# Altium PCB BUCK-BOOST_PFC_Mainboard.PcbDoc
Units mm, origin at the board's own origin, x right, y up, seen from the top; angles counter-clockwise.
Board outline 270 x 140 mm, 2 copper layers (Top Layer, Bottom Layer); 102 components, 40 nets, 272 pads, 435 vias.
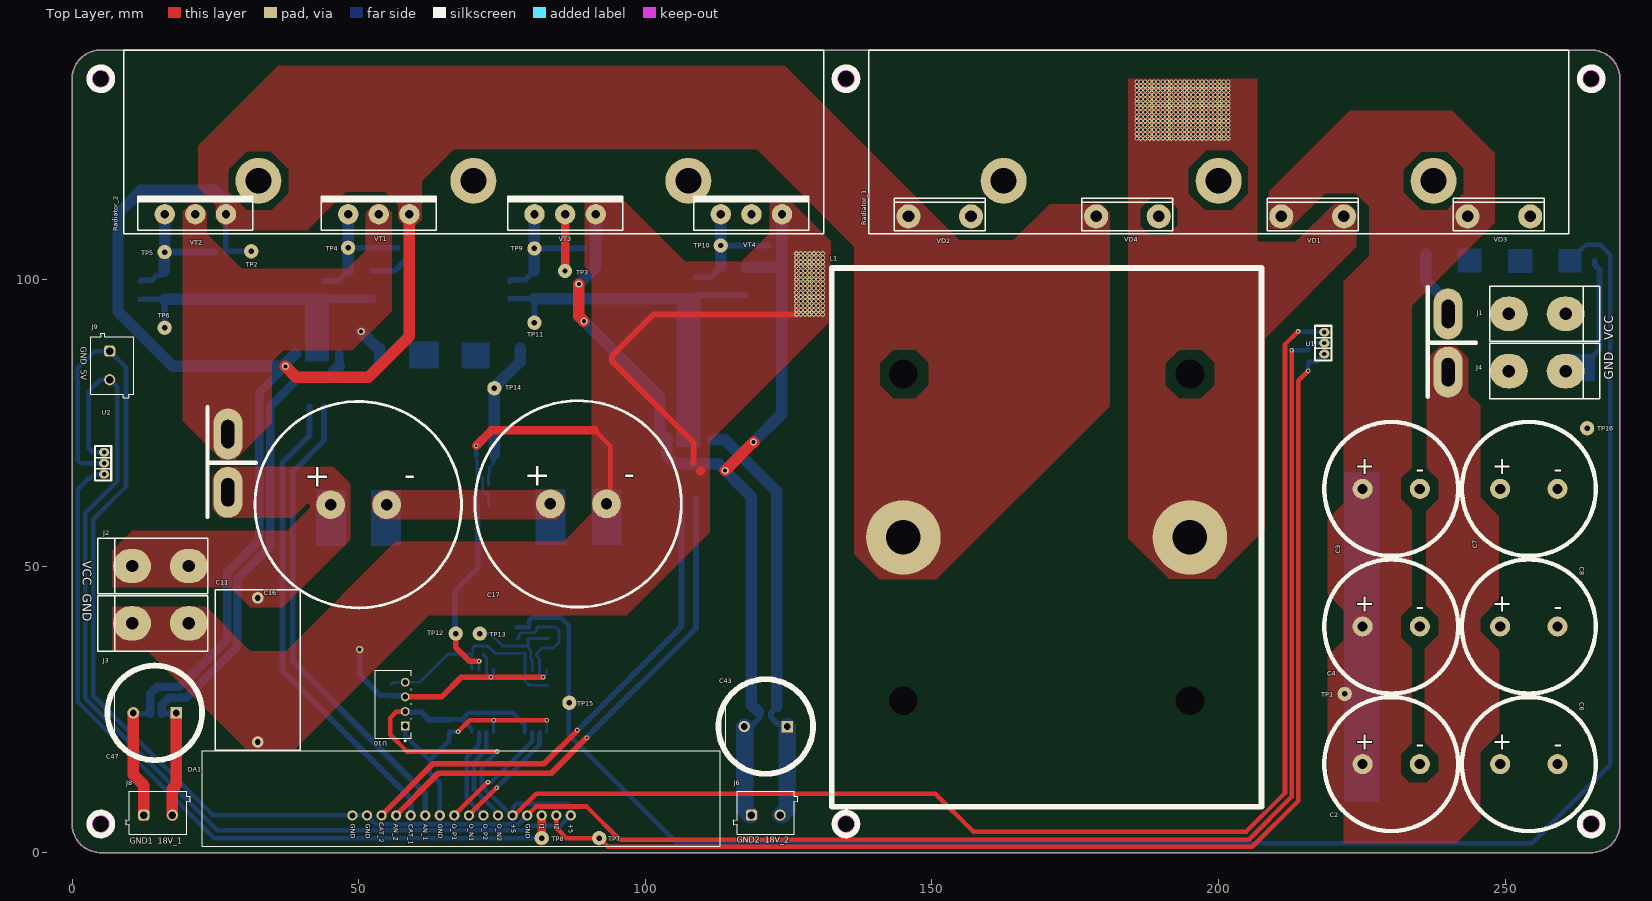
[diagram p0: Top Layer view]
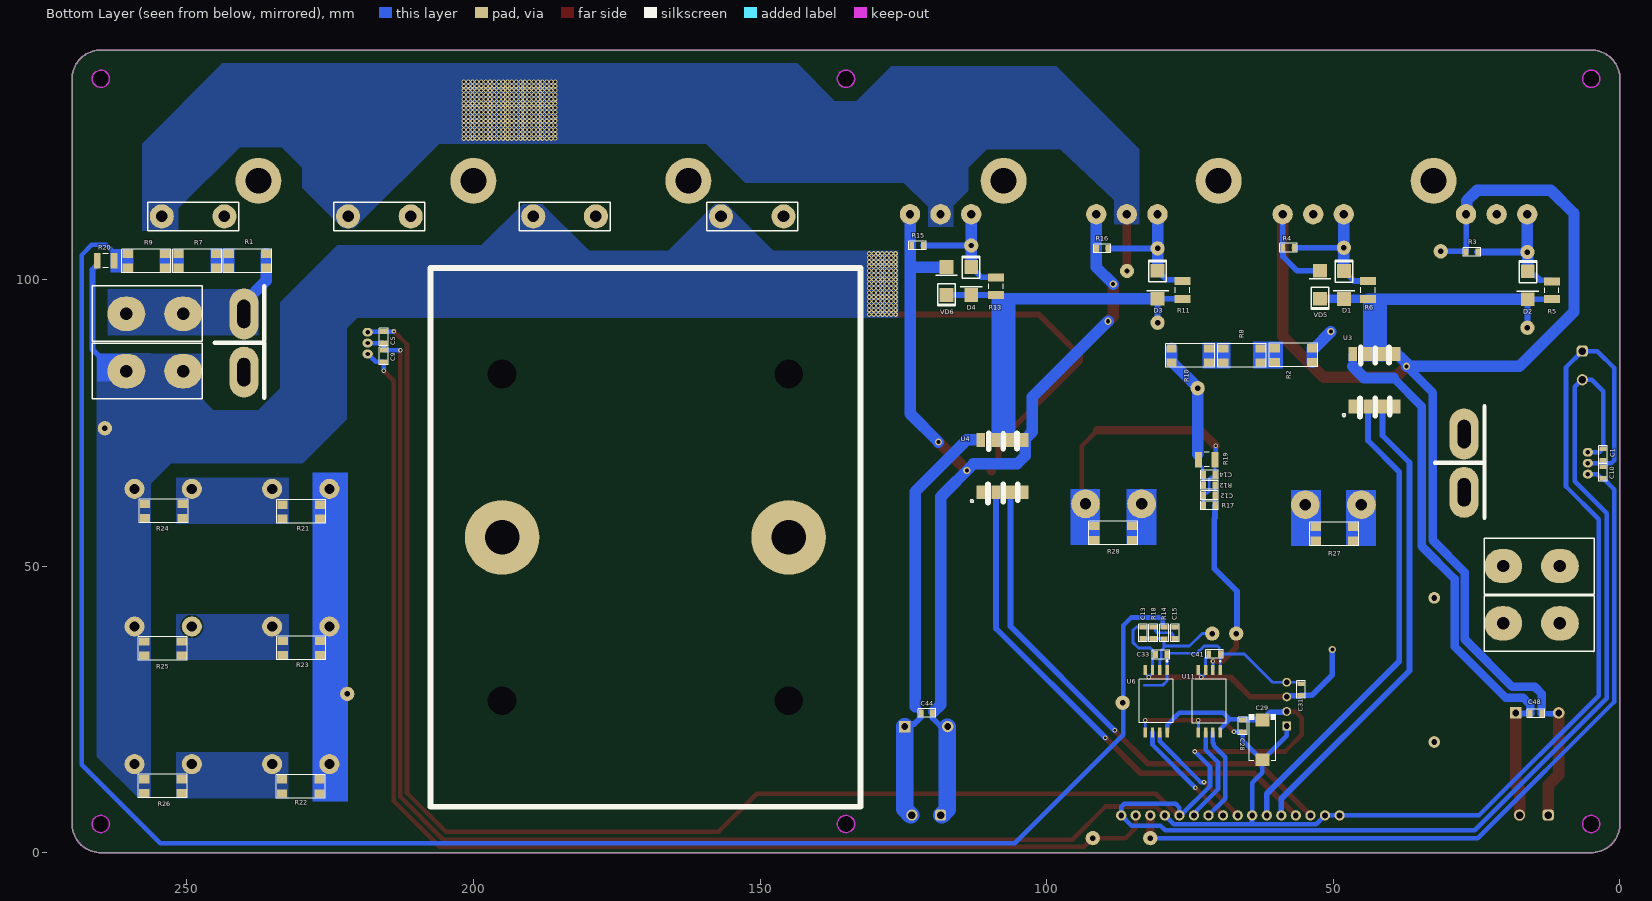
[diagram p1: Bottom Layer view, seen from below]
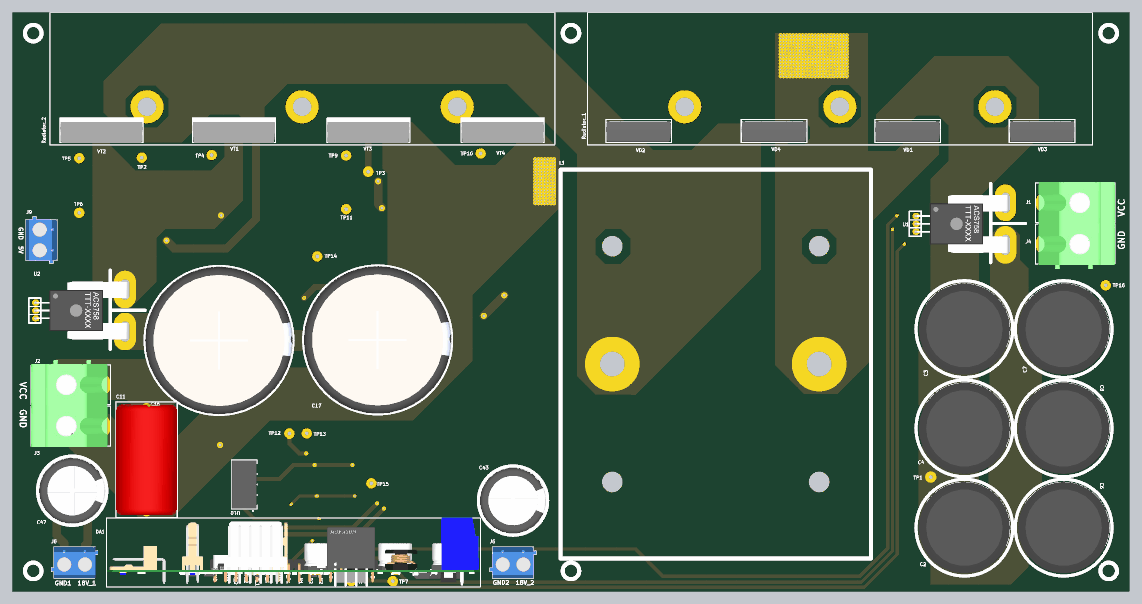
[diagram p2: 3D render of the assembled board from above, using the file's embedded part models]
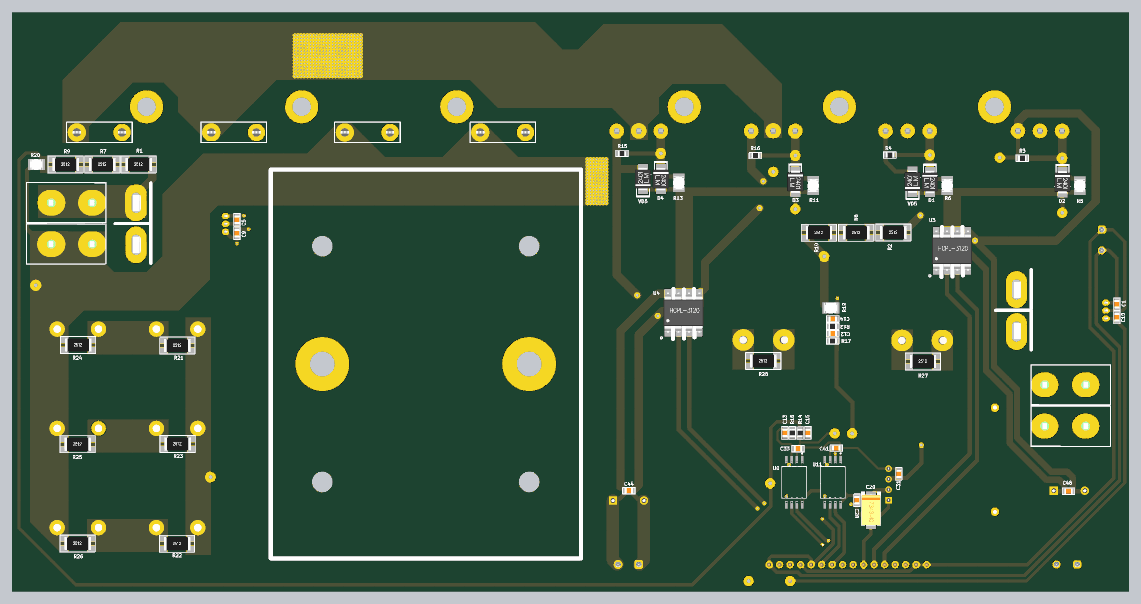
[diagram p3: 3D render of the assembled board from below, using the file's embedded part models]

## Layer stack, top to bottom
Top Solder: solder mask 0.0102, Solder Resist, Dk 3.5
Top Layer: signal copper 0.0356
Dielectric 1: dielectric 0.32, FR-4, Dk 4.8
Bottom Layer: signal copper 0.0356
Bottom Solder: solder mask 0.0102, Solder Resist, Dk 3.5

## Board outline
5,0 cw(c5,5) 0,5 0,135 cw(c5,135) 5,140 265,140 cw(c265,135) 270,135 270,5 cw(c265,5) 265,0
cut-out: 133.5,5 ccw(c135,5) 135,3.5 ccw(c135,5) 136.5,5 ccw(c135,5) 135,6.5 ccw(c135,5)
cut-out: 5,3.5 cw(c5,5) 3.5,5 cw(c5,5) 5,6.5 cw(c5,5) 6.5,5 cw(c5,5)
cut-out: 263.5,5 ccw(c265,5) 265,3.5 ccw(c265,5) 266.5,5 ccw(c265,5) 265,6.5 ccw(c265,5)
cut-out: 263.5,135 ccw(c265,135) 265,133.5 ccw(c265,135) 266.5,135 ccw(c265,135) 265,136.5 ccw(c265,135)
cut-out: 135,133.5 cw(c135,135) 133.5,135 cw(c135,135) 135,136.5 cw(c135,135) 136.5,135 cw(c135,135)
cut-out: 5,133.5 cw(c5,135) 3.5,135 cw(c5,135) 5,136.5 cw(c5,135) 6.5,135 cw(c5,135)

## Design rules (kind name [scope] priority, off if disabled: settings)
Clearance [All] p1: gap=0.254 ignorepadtopadclearanceinfootprint=FALSE except(0: Arc-Hole Track-Hole SMDPad-Hole THPad-Hole Via-Hole Fill-Hole Poly-Hole Region-Hole Text-Hole)
ComponentClearance [All] p1: gap=-2 collisioncheckmode=3 verticalgap=0.254 showdistances=FALSE
Height [All] p1: minheight=0 maxheight=100 prefheight=100
PolygonConnect [All] p1: connectstyle=Relief reliefconductorwidth=0.254 reliefentries=4 polygonreliefangle="90 Angle" airgapwidth=0.254
RoutingVias [All] p1: holewidth=0.711 width=1.27 viastyle="Through Hole" minholewidth=0.711 minwidth=1.27 maxholewidth=0.711 maxwidth=1.27
SolderMaskExpansion [All] p1: expansion=0.102 istentingtop=FALSE
Width [All] p1: maxlimit=5 minlimit=0.254 preferedwidth=0.254
28 further rules are at their usual default settings.

## Components (designator, comment, footprint, x,y, rotation, side; value= is the part's Value field where it differs from the comment)
C1 "1uF" CAP-0805 2.921,69.469 r90 bottom
C2 "CAP-POLAR" "CAP 100uF_500V 22x40mm" 230.115,15.452 r0 top locked
C3 "CAP-POLAR" "CAP 100uF_500V 22x40mm" 230.115,63.452 r0 top locked
C4 "CAP-POLAR" "CAP 100uF_500V 22x40mm" 230.115,39.452 r0 top locked
C5 "1uF" CAP-0805 215.646,89.916 r90 bottom
C6 "CAP-POLAR" "CAP 100uF_500V 22x40mm" 254.115,15.452 r0 top locked
C7 "CAP-POLAR" "CAP 100uF_500V 22x40mm" 254.115,63.452 r0 top locked
C8 "CAP-POLAR" "CAP 100uF_500V 22x40mm" 254.115,39.452 r0 top locked
C9 "0.1uF" CAP-0805 215.646,86.614 r270 bottom
C10 "0.1uF" CAP-0805 2.921,66.294 r270 bottom
C11 "CAP-NON-POLAR" CAP_4.7uF_630V 32.385,31.877 r90 top
C12 "0.33uF" CAP-0805 71.628,62.357 r180 bottom
C13 "0.33uF" CAP-0805 83.185,38.354 r270 bottom
C14 "0.1uF" CAP-0805 71.628,65.913 r0 bottom
C15 "0.1uF" CAP-0805 77.597,38.354 r90 bottom
C16 "CAP-POLAR" CAP_POL_36X60 49.911,60.706 r0 top locked
C17 "CAP-POLAR" CAP_POL_36X60 88.265,60.833 r0 top locked
C28 "0.1uF" CAP-0805 65.786,22.098 r270 bottom
C29 "47uF_16V" CAP-TAN-D 62.357,19.685 r270 bottom
C31 "0.1uF" CAP-0805 55.626,28.448 r90 bottom
C33 "0.1uF" CAP-0805 80.01,34.544 r0 bottom
C41 "0.1uF" CAP-0805 70.739,34.671 r180 bottom
C43 "1000uF_50V" CAPPOL-16x25 121,22 r180 top locked
C44 "0.1uF" CAP-0805 120.904,24.384 r0 bottom
C47 "1000uF_50V" CAPPOL-16x25 14.418,24.384 r180 top locked
C48 "0.1uF" CAP-0805 14.605,24.257 r0 bottom
D1 "US1G" DO-214AA 48.133,96.973 r90 bottom
D2 "US1G" DO-214AA 16.066,96.909 r90 bottom
D3 "US1G" DO-214AA 80.645,97.028 r90 bottom
D4 "US1G" DO-214AA 113.157,97.663 r90 bottom
DA1 "BOARD_PFC" BOARD_PFC 68,10 r180 top locked
J1 "MG_136_HT" Conn_MEIGAN_MG136HT 258,94 r90 top locked
J2 "MG_136_HT" Conn_MEIGAN_MG136HT 13,50 r270 top locked
J3 "MG_136_HT" Conn_MEIGAN_MG136HT 13,40 r270 top locked
J4 "MG_136_HT" Conn_MEIGAN_MG136HT 258,84 r90 top locked
J6 "691102710002" 691102710002 121,7 r0 top locked
J8 "691102710002" 691102710002 15,7 r0 top locked
J9 "691102710002" 691102710002 7,85 r270 top locked
L1 "Coil" 30A_10uH 170,55 r90 top locked
R1 "" RES-2512 239.395,103.251 r180 bottom
R2 "" RES-2512 56.923,86.786 r180 bottom
R3 "4.7K" RES-0805 25.781,104.775 r180 bottom
R4 "4.7K" RES-0805 57.785,105.537 r180 bottom
R5 "10E" RES_SMD_1210_IPC_A 11.874,98.108 r90 bottom
R6 "10E" RES_SMD_1210_IPC_A 43.942,98.171 r90 bottom
R7 "" RES-2512 248.158,103.251 r180 bottom
R8 "" RES-2512 65.913,86.741 r180 bottom
R9 "" RES-2512 257.048,103.251 r180 bottom
R10 "" RES-2512 74.93,86.741 r180 bottom
R11 "10E" RES_SMD_1210_IPC_A 76.327,98.171 r270 bottom
R12 "1K" RES-0805 71.628,64.135 r180 bottom
R13 "10E" RES_SMD_1210_IPC_A 108.839,98.806 r270 bottom
R14 "1K" RES-0805 79.502,38.338 r270 bottom
R15 "4.7K" RES-0805 122.555,105.918 r180 bottom
R16 "4.7K" RES-0805 90.297,105.41 r180 bottom
R17 "1M" RES-0805 71.628,60.579 r180 bottom
R18 "1M" RES-0805 81.407,38.354 r270 bottom
R19 "RES_1210" RES_SMD_1210_IPC_B 72.063,68.58 r0 bottom
R20 "RES_1210" RES_SMD_1210_IPC_B 264.16,103.251 r180 bottom
R21 "1M" RES-2512 230.024,59.481 r180 bottom locked
R22 "1M" RES-2512 230.124,11.557 r180 bottom locked
R23 "1M" RES-2512 229.997,35.687 r180 bottom locked
R24 "1M" RES-2512 254.027,59.608 r180 bottom locked
R25 "1M" RES-2512 254.154,35.605 r180 bottom locked
R26 "1M" RES-2512 254.154,11.602 r180 bottom locked
R27 "1M" RES-2512 49.784,55.626 r180 bottom
R28 "1M" RES-2512 88.392,55.753 r180 bottom
Radiator_1 "Radiator_122X80_M4" Radiator_122X80_M4 200,124 r0 top locked
Radiator_2 "Radiator_122X80_M4" Radiator_122X80_M4 70,124 r0 top locked
TP1 "Test_Point_PCB" Test_Point 221.996,27.686 r0 top
TP2 "Test_Point_PCB" Test_Point 31.242,104.902 r0 top
TP3 "Test_Point_PCB" Test_Point 85.979,101.473 r0 top
TP4 "Test_Point_PCB" Test_Point 48.133,105.537 r0 top
TP5 "Test_Point_PCB" Test_Point 16.129,104.775 r0 top
TP6 "Test_Point_PCB" Test_Point 16.129,91.567 r0 top
TP7 "Test_Point_PCB" Test_Point 91.948,2.54 r0 top
TP8 "Test_Point_PCB" Test_Point 81.915,2.54 r0 top
TP9 "Test_Point_PCB" Test_Point 80.645,105.41 r0 top
TP10 "Test_Point_PCB" Test_Point 113.157,105.918 r90 top
TP11 "Test_Point_PCB" Test_Point 80.645,92.456 r90 top
TP12 "Test_Point_PCB" Test_Point 66.929,38.227 r0 top
TP13 "Test_Point_PCB" Test_Point 71.12,38.227 r90 top
TP14 "Test_Point_PCB" Test_Point 73.66,81.026 r0 top
TP15 "Test_Point_PCB" Test_Point 86.741,26.162 r0 top
TP16 "Test_Point_PCB" Test_Point 264.287,74.041 r90 top
U1 "ACS758" ACS758-100 228.219,88.9 r270 top
U2 "ACS758" ACS758-100 15.367,67.945 r270 top locked
U3 "HCPL-3120" HCPL-3120 42.799,82.423 r270 bottom
U4 "HCPL-3120" HCPL-3120 107.696,67.437 r270 bottom
U6 "AMC1311" FP-DWV0008A-MFG 80.899,26.427 r270 bottom
U10 "B0505S-1W" B0505S-1W 56.007,25.908 r90 top
U11 "AMC1311" FP-DWV0008A-MFG 71.628,26.416 r270 bottom
VD1 "MUR4060" TO-247-2 216.397,111 r0 top locked
VD2 "MUR4060" TO-247-2 151.353,111 r0 top locked
VD3 "MUR4060" TO-247-2 248.897,111 r0 top locked
VD4 "MUR4060" TO-247-2 184.103,111 r0 top locked
VD5 "Suppressor" DO-214AA 52.324,101.147 r270 bottom
VD6 "Suppressor" DO-214AA 117.475,101.782 r270 bottom
VT1 "IGBT 60N120T" TO-264-3 53.5,112 r0 top locked
VT2 "IGBT 60N120T" TO-264-3 21.5,112 r0 top locked
VT3 "IGBT 60N120T" TO-264-3 86,112 r0 top locked
VT4 "IGBT 60N120T" TO-264-3 118.5,112 r0 top locked

## Footprints (in the part's own frame and the unit in brackets; to place one, negate y for a bottom-side part, rotate by r counter-clockwise, add the part's x,y. Pads: shape width x height; smd on the part's side, far side on the other; paste and mask are expansions set on the pad)
30A_10uH [mm]
  round 13 hole 6: 1(0,25) 2(0,-25)
  round 1.524 hole 5: 3(-28.5,-25) 3(-28.5,25) 3(28.5,-25) 3(28.5,25)
  silkscreen extent -47,-37.5 47,37.5, body extent -46.95,-37.33 46.95,37.43, height 99.93
691102710002 [mm] "5,00mm - modular - blue - Horizontal entry with pressure clamp - 9,9 mm height - 02p"
  rrect50% 1.95x1.95 hole 1.3: 1(-2.5,-0.45)
  round 1.95 hole 1.3: 2(2.5,-0.45)
  silkscreen extent -5.6,-3.75 5.6,3.75, body extent -5.6,-3.75 5.6,3.75, height 9.96
ACS758-100 [mil]
  oval 60x70 hole 30: 1(-75,-385) 2(0,-385) 3(75,-385)
  oval 350x200 hole 90 slot 195 at 0 deg: 4(200,465) 5(-200,465)
  silkscreen extent -385,-449 370,665, body extent -276,-404 276,492, height 280
B0505S-1W [mm]
  rect 1.55x1.55 hole 1 paste-2539.97 mask+0: 1(-3.81,-2.1)
  round 1.55 hole 1 paste-2539.97 mask+0: 2(-1.27,-2.1) 3(1.27,-2.1) 4(3.81,-2.1)
  silkscreen extent -6.52,-3.13 5.92,3.13, body extent -6.02,-3.22 6.02,3.22, height 0.25
BOARD_PFC [mm]
  round 1.8 hole 1: 1(-19,3.5) 2(-16.46,3.5) 3(-13.92,3.5) 4(-11.38,3.5) 5(-8.84,3.5) 6(-6.3,3.5) 7(-3.76,3.5) 8(-1.22,3.5) 9(1.32,3.5) 10(3.86,3.5) 11(6.4,3.5) 12(8.94,3.5) 13(11.48,3.5) 14(14.02,3.5) 15(16.56,3.5) 16(19.1,3.5)
  silkscreen extent -45.1,-7.8 45.3,8.9, body extent -44.98,-7.85 45.13,8.9, height 75.28
"CAP 100uF_500V 22x40mm" [mm]
  round 3.5 hole 1.8: 1(-5,0) 2(5,0)
  silkscreen extent -11.68,-11.68 11.68,11.68, body extent -11,-11 11.1,11.1, height 31.53
CAP-0805 [mm]
  rect 0.8x1.25 smd mask+0.015: 1(-1,0) 2(1,0)
  silkscreen extent -1.52,-0.76 1.52,0.76, body extent -1,-0.62 1,0.63, height 0.8
CAP-TAN-D [mm]
  rect 2.2x2.5 smd: 1(-3.45,0) 2(3.45,0)
  silkscreen extent -4.5,-2.4 3.65,2.4, body extent -3.8,-2.3 3.8,2.3, height 4
CAP_4.7uF_630V [mil]
  round 80 hole 40: 1(-495,0) 2(495,0)
  silkscreen extent -550,-293 550,293, body extent -527,-289 527,289, height 1242
CAP_POL_36X60 [mm]
  round 5 hole 2: 1(-4.826,0) 2(4.953,0)
  silkscreen extent -18,-18 18,18, body extent -17.85,-17.85 17.85,17.86, height 62.85
CAPPOL-16x25 [mm]
  rect 2x2 hole 1.2 paste-2539.97 mask+0: 1(-3.75,0)
  round 2 hole 1.2 paste-2539.97 mask+0: 2(3.75,0)
  silkscreen extent -8.25,-8.25 8.25,8.25, body extent -8.35,-8.35 8.35,8.35, height 0.25
Conn_MEIGAN_MG136HT [mm]
  oval 6x6.6 hole 2.159: 1(0,7.366) 1(0,-2.54)
  silkscreen extent -4.83,-8.51 4.83,10.67, body extent -6,-8.55 5,9.95, height 30.95
DO-214AA [mm]
  rect 2.4x2.4 smd: 1(-0.381,0) 2(4.5,0)
  silkscreen extent 1.02,-1.91 6.35,1.91, body extent -0.75,-1.97 4.85,1.97, height 2.65
FP-DWV0008A-MFG [mm]
  rect 1.8x0.6 smd paste+0 mask+0: 1(-5.45,1.905) 2(-5.45,0.635) 3(-5.45,-0.635) 4(-5.45,-1.905) 5(5.45,-1.905) 6(5.45,-0.635) 7(5.45,0.635) 8(5.45,1.905)
  silkscreen extent -7.1,-2.98 3.8,2.98, body extent -5.75,-2.93 5.75,2.93, height 2.8
HCPL-3120 [mil]
  rect 94.49x60 smd mask+4: 1(180,-150) 2(180,-45) 3(180,55) 4(180,150) 5(-180,150) 6(-180,55) 7(-180,-45) 8(-180,-150)
  silkscreen extent -225,-220 250,105, body extent -191,-191 191,191, height 181
Radiator_122X80_M4 [mm]
  round 8 hole 4.5: 1(-37.5,-6.8) 1(0,-6.8) 1(37.5,-6.8)
  silkscreen extent -61,-16 61.1,16, body extent -61,-16 61,16, height 80.27
RES-0805 [mm]
  rect 0.8x1.25 smd mask+0.015: 1(-1,0) 2(1,0)
  silkscreen extent -1.52,-0.76 1.52,0.76, body extent -1,-0.62 1,0.63, height 0.6
RES-2512 [mm]
  rect 1.8x1.45 smd: 1(-3.275,-1.225) 1(-3.275,1.225) 2(3.275,-1.225) 2(3.275,1.225)
  silkscreen extent -4.28,-2.05 4.25,2.05, body extent -3.2,-1.6 3.2,1.6, height 0.6
RES_SMD_1210_IPC_A [mm]
  rect 1.405x2.806 smd paste+0 mask+0: 1(-1.551,0) 2(1.551,0)
  silkscreen extent -0.47,-1.25 0.47,1.25, body extent -1.6,-1.25 1.6,1.25, height 0.6
RES_SMD_1210_IPC_B [mm]
  rect 1.205x2.706 smd paste+0 mask+0: 1(-1.451,0) 2(1.451,0)
  silkscreen extent -0.47,-1.25 0.47,1.25, body extent -1.6,-1.25 1.6,1.25, height 0.6
Test_Point [mm]
  round 2.5 hole 0.95: 1(0,0)
TO-247-2 [mm]
  round 4.2 hole 2.032: 1(-5.461,0) 3(5.461,0)
  silkscreen extent -7.94,-2.48 7.94,3.17, body extent -7.9,-2.3 7.9,2.71, height 37.4
TO-264-3 [mm]
  round 3.55 hole 1.45: 1(-5.334,-0.635) 2(0,-0.635) 3(5.334,-0.635)
  silkscreen extent -10.03,-3.43 10.03,2.54, body extent -10,-3.5 10,1.5, height 38.4

## Part data
C1 C5 C9 C10 C12 C13 C14 C15 C28 C31 C33 C41 C44 C48: library part CAP-NON-POLAR
C29 C43 C47: library part CAP-POLAR
J1 J2 J3 J4: library part Connector_MEIGAN_MG136HT
J6 J8 J9: "WR-TBL Series 102 Horizontal Entry Modular, THT, pitch 5mm, 2p", Manufacturer="Wurth Elektronik", Operating Temperature Max=105°C, Operating Temperature Min=-40°C, Rated Current=15A, Working Voltage=250V, Application="Pressure Clamp", Category="Terminal Blocks", ComponentLink1Description="Website Link", ComponentLink1URL=https://www.we-online.com/redexpert/article/691102710002?ad, ComponentLink2Description="Datasheet Link", ComponentLink2URL=https://www.we-online.com/redexpert/spec/691102710002?ad, Manufacturer Part Number=691102710002, Match Code=WR-TBL, Modularity=Yes, Mount="Through Hole", Number of Pins=2, Number of Rows=1, Orientation=Horizontal, Packaging=Box, Pitch=5mm
R1 R2 R3 R4 R7 R8 R9 R10 R12 R14 R15 R16 R17 R18: library part RES-CONST
R5 R6 R11 R13: library part RES_1210
R21 R22 R23 R24 R25 R26 R27 R28: library part RES-CONST, "4.7K"
TP1 TP2 TP3 TP4 TP5 TP6 TP7 TP8 TP9 TP10 TP11 TP12 TP13 TP14 TP15 TP16: library part TP_PCB?, "Test_Point"
VT1 VT2 VT3 VT4: "IGBT 60N120T TO-264-3"

## Via types
v1: diameter 0.8, hole 0.4, Top Layer to Bottom Layer, 428 vias
v2: diameter 1.27, hole 0.711, Top Layer to Bottom Layer, 7 vias

## Nets (pads, with @x,y where several pads share a name; then routed paths per layer and width w, separated by ;. In a path a pad name is that pad's centre, name@x,y a point inside that pad or via, vN(x,y) a via of type N, cw(c..) or ccw(c..) an arc to the next point about the centre after c; other vN are vias at no path point)
+5: C1.2 C5.2 C28.1 C29.1 DA1.1 DA1.5 J9.2 U1.1 U2.1 U6.8 U10.2 U11.8 | length 480.2
  Top Layer w0.8: U10.2 58.037,24.568 56.572,24.568 55.499,23.495 55.499,20.574 58.42,17.653 v1(74.168,17.653) ; DA1.5 77.111,6.5 77.611,7 77.682,7 80.969,10.287 150.568,10.287 157.172,3.683 204.851,3.683 211.582,10.414 211.582,88.646 v1(213.868,90.932)
  Bottom Layer w0.5: U11.8@69.673,21.64 69.673,21.016 U11.8
  Bottom Layer w0.8: C1.2 2.921,80.518 4.903,82.5 J9.2 ; C1.2@3.146,70.469 3.146,70.319 3.615,69.85 U2.1 ; J9.2@6.602,82.552 7.874,81.28 7.874,64.77 2.286,59.182 2.286,26.924 25.318,3.892 79.33,3.892 80.137,4.699 85.199,4.699 DA1.1 87,7.996 86.487,8.509 77.47,8.509 76.84,7.879 DA1.5 76.591,6.5 71.501,11.59 71.501,14.986 v1(74.168,17.653) ; C28.1 66.245,23.098 66.388,23.241 68.072,23.241 ; U11.8@69.673,21.64 68.072,23.241 ; U6.8 78.994,22.225 76.835,24.384 69.215,24.384 68.072,23.241 ; v1(213.868,90.932) 213.931,90.868 218.376,90.868 U1.1
  Bottom Layer w1: U10.2 58.212,24.533 58.899,24.533 58.92,24.511 60.981,24.511 61.607,23.885 61.607,23.735 62.207,23.135 C29.1 ; C29.1@62.357,23.241 C28.1@65.786,23.241
+18_1: C43.1 C44.2 J6.2 U4.8 | length 74.3
  Bottom Layer w1: 122.936,25.416 122.129,24.609 122.104,24.609 122.004,24.509 122.004,24.484 C44.2 121.904,23.638 123.085,22.457 124.293,22.457 C43.1 ; J6.2 J6.2@123.689,6.55
  Bottom Layer w2: U4.8@111.76,72.009 113.919,72.009 122.936,62.992 122.936,25.416
  Bottom Layer w3: J6.2@123.689,6.55 124.75,7.611 C43.1
+18_2: C47.1 C48.2 J8.2 U3.8 | length 101.1
  Top Layer w2: J8.2 17.5,11.15 18.168,11.818 C47.1
  Bottom Layer w1: C48.2 18.041,24.257 C47.1
  Bottom Layer w1.5: C48.2 15.605,25.765 16.891,27.051 19.939,27.051 28.829,35.941 28.829,47.752 34.544,53.467 34.544,77.851 39.497,82.804 ; 46.609,84.836 U3.8
  Bottom Layer w2: 39.497,82.804 44.577,82.804 46.609,84.836
GND: C6.2 C7.2 C8.2 C11.1 C12.1 C13.1 C14.1 C15.1 C17.2 C31.1 C33.2 C41.1 C43.2 C44.1 J3.1 J4.1 J6.1 R15.1 R16.1 R17.1 R18.1 R19.1 R20.1 R24.1 R25.1 R26.1 R28.1 TP16.1 U4.5 U6.3 U6.4 U10.3 U11.3 U11.4 VD2.3 VD4.3 VD6.1 VT3.3 VT4.3 | length 378.8
  Top Layer w0.8: 91.186,73.66 93.903,70.943 93.903,61.518 C17.2
  Top Layer w1: U10.3 64.457,27.178 67.886,30.607 v1(73.025,30.607) v1(82.169,30.607) ; 108.331,67.945 108.383,67.997 108.383,70.07 108.458,70.145 108.458,71.465 94.12,85.803 94.12,86.631 101.377,93.888 v1(126.351,93.888)
  Top Layer w1.5: v1(70.485,70.993) 73.152,73.66 91.186,73.66 ; 109.601,66.548 109.728,66.675
  Top Layer w2: v2(88.392,99.187) 88.392,93.599 v2(89.281,92.71) ; v2(113.919,66.675) v2(118.872,71.628)
  Bottom Layer w0.5: R19.1 70.62,68.572 70.62,65.921 C14.1 70.628,65.688 70.778,65.538 71.335,65.538 71.628,65.245 71.628,63.025 71.921,62.732 72.478,62.732 72.628,62.582 C12.1 R17.1 ; C41.1 71.739,34.446 72.263,33.922 U11.3 72.263,31.266 72.865,30.664 72.968,30.664 v1(73.025,30.607) ; v1@72.898,30.769 72.919,30.748 73.015,30.748 73.533,31.266 U11.4 U11.4@73.533,32.004 ; C15.1 77.814,37.354 77.964,37.504 77.964,38.073 78.257,38.366 80.739,38.366 81.032,38.659 81.032,39.204 81.182,39.354 R18.1 C13.1 84.344,39.354 84.963,38.735 84.963,36.703 83.947,35.687 81.915,35.687 81.16,34.932 81.16,34.694 C33.2 ; C33.2@81.01,34.394 81.01,34.319 81.534,33.795 U6.3 81.534,31.277 82.169,30.642 v1(82.169,30.607) 82.345,30.783 82.345,30.818 82.804,31.277 U6.4
  Bottom Layer w0.8: R19.1@70.485,69.215 v1(70.485,70.993)
  Bottom Layer w1: v2(50.165,35.433) 50.165,30.988 53.705,27.448 C31.1 55.689,27.385 57.751,27.385 57.958,27.178 U10.3 ; R16.1 R16.1@91.316,105.429 ; VT3.3@91.316,111.347 VT3.3 ; C43.2 117.441,22.191 118.584,22.191 119.904,23.511 C44.1 119.804,24.484 119.804,24.509 119.704,24.609 C44.1@119.679,24.609 ; R15.1 R15.1@123.567,105.931 ; VT4.3@123.821,111.353 VT4.3 ; J4.1@260.54,84 262.689,84 262.689,84.496 263.15,84.957 263.646,84.957 266.446,87.757 266.446,101.727 265.775,102.398 265.713,102.398 265.611,102.5 R20.1
  Bottom Layer w2: v2(88.392,99.187) 91.305,102.1 R16.1@91.305,105.285 ; v2(89.281,92.71) 102.489,79.502 102.489,73.406 U4.5@103.436,72.459 ; R16.1@91.316,105.429 VT3.3@91.316,111.347 ; U4.5 103.696,71.819 103.696,69.278 105.156,67.818 112.776,67.818 118.491,62.103 118.491,25.797 C44.1@119.679,24.609 ; VD6.1 123.809,102.163 ; v2(118.872,71.628) 123.809,76.565 123.809,102.163 ; R15.1@123.809,105.918 123.809,102.163 ; R15.1@123.821,105.931 VT4.3@123.821,111.353
  Bottom Layer w3: C43.2@117.345,21.905 117.345,7.516 J6.1@118.311,6.55
  other v1: 127.113,93.888 127.875,93.888 128.637,93.888 129.399,93.888 130.161,93.888 130.923,93.888 126.351,94.65 127.113,94.65 127.875,94.65 128.637,94.65 129.399,94.65 130.161,94.65 130.923,94.65 126.351,95.412 127.113,95.412 127.875,95.412 128.637,95.412 129.399,95.412 130.161,95.412 130.923,95.412 126.351,96.174 127.113,96.174 127.875,96.174 128.637,96.174 129.399,96.174 130.161,96.174 130.923,96.174 126.351,96.936 127.113,96.936 127.875,96.936 128.637,96.936 129.399,96.936 130.161,96.936 130.923,96.936 126.351,97.698 127.113,97.698 127.875,97.698 128.637,97.698 129.399,97.698 130.161,97.698 130.923,97.698 126.351,98.46 127.113,98.46 127.875,98.46 128.637,98.46 129.399,98.46 130.161,98.46 130.923,98.46 126.351,99.222 127.113,99.222 127.875,99.222 128.637,99.222 129.399,99.222 130.161,99.222 130.923,99.222 126.351,99.984 127.113,99.984 127.875,99.984 128.637,99.984 129.399,99.984 130.161,99.984 130.923,99.984 126.351,100.746 127.113,100.746 127.875,100.746 128.637,100.746 129.399,100.746 130.161,100.746 130.923,100.746 126.351,101.508 127.113,101.508 127.875,101.508 128.637,101.508 129.399,101.508 130.161,101.508 130.923,101.508 126.351,102.27 127.113,102.27 127.875,102.27 128.637,102.27 129.399,102.27 130.161,102.27 130.923,102.27 126.351,103.032 127.113,103.032 127.875,103.032 128.637,103.032 129.399,103.032 130.161,103.032 130.923,103.032 126.351,103.794 127.113,103.794 127.875,103.794 128.637,103.794 129.399,103.794 130.161,103.794 130.923,103.794 126.365,104.521 127.127,104.521 127.889,104.521 128.651,104.521 129.413,104.521 130.175,104.521 130.937,104.521
GND_II: C47.2 C48.1 J8.1 L1.1 R3.1 R4.1 TP2.1 U3.5 VD2.1 VD4.1 VD5.1 VT1.3 VT2.3 | length 243.5
  Top Layer w2: C47.2 10.668,13.589 12.5,11.757 J8.1 ; v2(37.211,84.836) 39.116,82.931 51.689,82.931 58.834,90.076 VT1.3
  Bottom Layer w1: C47.2 10.797,24.255 C48.1@13.489,24.255 ; R3.1 26.781,104.8 26.881,104.9 26.906,104.9 26.908,104.902 TP2.1 ; R3.1@26.8,104.9 VT2.3@26.8,111.33 ; VD5.1 56.316,101.528 58.785,103.997 R4.1 ; R4.1@58.817,105.537 58.817,111.348 VT1.3
  Bottom Layer w1.5: C48.1 13.605,27.702 14.859,28.956 18.796,28.956 27.051,37.211 27.051,48.895 32.639,54.483 32.639,80.264 v2(37.211,84.836) ; VT2.3@26.746,111.453 VT2.3
  Bottom Layer w2: VT2.3@26.746,111.453 26.746,113.716 24.892,115.57 12.065,115.57 8.001,111.506 8.001,94.361 17.526,84.836 v2(37.211,84.836) 37.211,85.385 38.383,86.557 38.513,86.557 38.951,86.995 U3.5
GND_III: C1.1 C5.1 C9.1 C10.1 C28.2 C29.2 DA1.4 DA1.10 DA1.15 DA1.16 J9.1 U1.2 U2.2 U6.5 U10.1 U11.5 | length 448.9
  Top Layer w0.8: v1(67.31,21.082) 69.342,23.114 v1(73.533,23.114) v1(82.804,23.114) ; DA1.4 80.934,8.054 89.736,8.054 95.504,2.286 205.232,2.286 212.725,9.779 v1(212.725,87.63)
  Bottom Layer w0.5: U11.5 v1(73.533,23.114) ; U6.5 v1(82.804,23.114)
  Bottom Layer w0.8: U2.2 2.921,67.945 1.485,67.945 1.016,68.414 1.016,84.582 3.934,87.5 J9.1 9.398,84.652 9.398,63.881 3.683,58.166 3.683,27.399 24.582,6.5 27.305,6.5 DA1.16 DA1.15 52.994,4.946 64.131,4.946 64.176,4.991 ; U10.1 58.107,20.379 C29.2@61.849,16.637 ; v1(67.31,21.082) 67.294,21.098 C28.2 65.786,19.514 62.507,16.235 C29.2 62.357,13.97 64.14,12.187 DA1.10 64.176,6.464 64.176,4.991 ; DA1.4 77.826,4.946 64.221,4.946 64.176,4.991 ; v1(212.725,87.63) 214.56,87.63 214.576,87.614 C9.1 C5.1 216.335,88.916 216.351,88.9 U1.2
NetC2_1: C2.1 C3.1 C4.1 R21.2 R22.2 R23.2 TP1.1 U1.4 VD1.1 VD3.1
NetC2_2: C2.2 C6.1 R22.1 R26.2
NetC3_2: C3.2 C7.1 R21.1 R24.2
NetC4_2: C4.2 C8.1 R23.1 R25.2
NetC9_2: C9.2 DA1.2 TP7.1 U1.3 | length 217
  Top Layer w0.8: DA1.2 84.46,4.313 86.233,2.54 TP7.1 93.472,1.016 205.867,1.016 213.868,9.017 213.868,82.296 v1(215.646,84.074)
  Bottom Layer w0.8: v1(215.646,84.074) C9.2 ; U1.3 217.059,85.614 C9.2@215.709,85.614 ; C9.2 C9.2@215.709,85.614 ; C9.2 C9.2@215.709,85.614
NetC10_2: C10.2 DA1.3 TP8.1 U2.3 | length 137.7
  Top Layer w0.8: TP8.1 TP8.1@81.918,2.543 ; DA1.3@81.918,6.498 DA1.3
  Top Layer w1.5: TP8.1@81.918,2.543 DA1.3@81.918,6.498
  Bottom Layer w0.8: C10.2@2.696,65.294 3.191,65.294 3.937,66.04 U2.3 ; C10.2 1.016,63.389 1.016,26.289 24.765,2.54 TP8.1
NetC11_2: C11.2 C16.1 J2.1 R27.2 U2.4
NetC12_2: C12.2 R12.2 R17.2 TP12.1 U11.2 | length 36.6
  Top Layer w1: TP12.1 66.929,35.814 69.342,33.401 v1(70.993,33.401)
  Bottom Layer w0.5: 70.628,58.404 70.739,58.293 ; R17.2 C12.2 R12.2 ; U11.2 v1(70.993,33.401)
  Bottom Layer w1: TP12.1@66.802,38.227 66.802,45.593 70.739,49.53 70.739,58.293 ; 70.628,58.404 R17.2
NetC13_2: C13.2 R14.2 R18.2 TP13.1 U6.2 | length 19.6
  Bottom Layer w0.5: TP13.1@70.231,38.227 TP13.1 ; TP13.1@71.247,38.354 71.399,38.202 72.923,38.202 75.057,36.068 79.502,36.068 ; U6.2 80.264,33.552 80.01,33.806 80.01,35.282 79.502,35.79 79.502,36.068 ; C13.2 83.177,37.346 81.407,37.346 79.51,37.346 R14.2 79.502,36.068
NetC14_2: C14.2 R10.1 R12.1 R19.2 TP14.1 | length 26.2
  Bottom Layer w0.254: TP14.1 TP14.1@73.66,81.146 ; R10.1@78.03,85.516 R10.1@78.205,85.516
  Bottom Layer w0.5: R12.1 C14.2 72.778,66.063 72.778,67.094 73.513,67.829 R19.2
  Bottom Layer w1: R19.2 73.513,69.331 R19.2@73.66,69.477
  Bottom Layer w2: R19.2@73.66,69.477 TP14.1 ; TP14.1@73.66,81.146 R10.1@78.03,85.516 ; R10.1@78.205,85.516 R10.1@78.205,87.966
NetC15_2: C15.2 R9.1 R14.1 R20.2 TP15.1 | length 323.9
  Bottom Layer w0.8: C15.2 79.261,39.354 79.277,39.338 R14.1 79.727,39.338 79.727,40.552 80.196,41.021 85.217,41.021 86.614,39.624 86.614,20.574 105.537,1.651 254.635,1.651 268.351,15.367 268.351,104.267 266.573,106.045 264.096,106.045 262.934,104.883 262.871,104.883 262.381,104.393 262.381,104.33 261.303,103.251 ; R20.2 R20.2@262.709,104.002
NetC16_2: C16.2 C17.1 R27.1 R28.2
NetC31_2: C31.2 C33.1 C41.2 U6.1 U10.4 U11.1 | length 38.9
  Bottom Layer w0.5: C31.2 55.776,29.598 56.174,29.598 56.294,29.718 60.579,29.718 65.532,34.671 C41.2@69.723,34.671 ; U11.1@69.723,32.004 C41.2@69.723,34.671 ; 82.931,29.21 79.756,29.21 78.994,29.972 U6.1 78.994,34.785 73.8,34.785 72.517,36.068 70.182,36.068 69.889,35.775 69.889,34.821 C41.2 C41.2@69.723,34.671
NetD1_1: D1.1 D2.1 R5.1 R6.1 TP6.1 U3.6 U3.7 VD5.2 | length 45.5
  Bottom Layer w1: R5.1 11.889,96.543 16.051,96.543 D2.1 ; D2.1@16.111,96.574 D2.1 ; TP6.1 16.097,91.599 16.097,96.497 D2.1 ; R6.1@43.896,96.574 R6.1 R6.1@43.955,96.634 ; VD5.2@52.311,96.634 VD5.2
  Bottom Layer w1.5: R6.1@43.955,96.634 VD5.2@52.311,96.634
  Bottom Layer w2: D2.1@16.111,96.574 R6.1@43.896,96.574
NetD1_2: D1.2 R4.2 R6.2 TP4.1 VT1.1 | length 23.5
  Bottom Layer w1: R6.2 46.382,99.722 D1.2 ; TP4.1@48.149,105.553 TP4.1 R4.2 ; VT1.1@48.149,111.348 VT1.1
  Bottom Layer w2: D1.2 TP4.1 ; TP4.1@48.149,105.553 VT1.1@48.149,111.348
NetD2_2: D2.2 R3.2 R5.2 TP5.1 VT2.1 | length 23.5
  Bottom Layer w1: R5.2 12.077,99.861 13.882,99.861 14.731,100.71 15.366,100.71 D2.2 ; TP5.1 16.137,104.783 TP5.1@16.148,104.794 ; VT2.1@16.148,111.347 VT2.1 ; R3.2@24.773,104.783 R3.2
  Bottom Layer w1.3: TP5.1@16.137,104.783 R3.2@24.773,104.783
  Bottom Layer w2: D2.2 TP5.1@16.066,104.712 ; TP5.1@16.148,104.794 VT2.1@16.148,111.347
NetD3_1: D3.1 D4.1 R11.2 R13.2 TP11.1 U4.6 U4.7 VD6.2 | length 44.6
  Bottom Layer w1: R11.2 76.34,96.634 80.632,96.634 80.645,96.62 TP11.1 ; R13.2 108.852,97.269 113.157,97.269 117.462,97.269 VD6.2
  Bottom Layer w2: D3.1 R13.2@108.125,96.647
NetD3_2: D3.2 R11.1 R16.2 TP9.1 VT3.1 | length 23.6
  Bottom Layer w1: R11.1 76.529,99.924 79.041,99.924 D3.2@80.656,101.539 ; TP9.1 R16.2 ; VT3.1@80.656,111.354 VT3.1
  Bottom Layer w2: D3.2@80.656,101.539 80.656,105.41 VT3.1@80.656,111.354
NetD4_2: D4.2 R13.1 R15.2 TP10.1 VT4.1 | length 22.7
  Bottom Layer w1: R13.1 111.351,100.357 D4.2 D4.2@113.162,102.168 ; TP10.1@113.162,105.918 TP10.1 R15.2 ; VT4.1@113.162,111.361 VT4.1
  Bottom Layer w2: D4.2@113.162,102.168 113.162,105.918 VT4.1@113.162,111.361
NetDA1_6: DA1.6 U11.6 | length 17.1
  Bottom Layer w0.8: U11.6 72.263,17.907 70.104,15.748 70.104,11.049 73.8,7.353 73.8,7.271 74.3,6.771 DA1.6
NetDA1_7: DA1.7 U11.7 | length 16.6
  Bottom Layer w0.8: U11.7 70.993,19.177 70.866,19.05 70.866,18.669 68.834,16.637 68.834,9.426 DA1.7
NetDA1_8: DA1.8 U6.6 | length 19.6
  Top Layer w0.8: DA1.8 74.023,11.303 v1(74.041,11.303)
  Bottom Layer w0.8: v1(74.041,11.303) 81.534,18.796 U6.6
NetDA1_9: DA1.9 U6.7 | length 20.5
  Top Layer w0.8: DA1.9 72.499,12.319 v1(72.555,12.319)
  Bottom Layer w0.8: v1(72.555,12.319) 73.152,12.319 80.264,19.431 U6.7
NetDA1_11: DA1.11 U3.2 | length 83.2
  Bottom Layer w1: U3.2 43.942,71.882 38.481,66.421 38.481,33.401 61.6,10.282 DA1.11
NetDA1_12: DA1.12 U3.3 | length 82.6
  Bottom Layer w1: U3.3 41.402,72.771 36.703,68.072 36.703,31.75 59.06,9.393 DA1.12
NetDA1_13: DA1.13 U4.2 | length 88.4
  Top Layer w1: DA1.13 63.863,13.843 83.566,13.843 v1(89.789,20.066)
  Bottom Layer w1: v1(89.789,20.066) 108.839,39.116 U4.2@108.839,61.722
NetDA1_14: DA1.14 U4.3 | length 88.2
  Top Layer w1: DA1.14 62.974,15.494 82.296,15.494 v1(88.138,21.336)
  Bottom Layer w1: v1(88.138,21.336) 106.299,39.497 U4.3@106.299,61.722
NetJ1_1: J1.1 R1.2 U1.5 | length 12.1
  Bottom Layer w2: R1.2@236.12,104.476 236.12,102.026 236.12,99.795 240.03,95.885 U1.5
NetL1_2: L1.2 TP3.1 VD1.3 VD3.3 VT3.2 VT4.2 | length 9.9
  Top Layer w1: TP3.1 TP3.1@85.99,101.484 ; VT3.2@85.99,111.354 VT3.2
  Top Layer w1.5: TP3.1@85.99,101.484 VT3.2@85.99,111.354
  other v1: 186.436,124.587 187.198,124.587 187.96,124.587 188.722,124.587 189.484,124.587 190.246,124.587 191.008,124.587 191.77,124.587 192.532,124.587 193.294,124.587 194.056,124.587 194.818,124.587 195.58,124.587 196.342,124.587 197.104,124.587 197.866,124.587 198.628,124.587 199.39,124.587 200.152,124.587 200.914,124.587 201.676,124.587 185.709,124.601 186.436,125.349 187.198,125.349 187.96,125.349 188.722,125.349 189.484,125.349 190.246,125.349 191.008,125.349 191.77,125.349 192.532,125.349 193.294,125.349 194.056,125.349 194.818,125.349 195.58,125.349 196.342,125.349 197.104,125.349 197.866,125.349 198.628,125.349 199.39,125.349 200.152,125.349 200.914,125.349 201.676,125.349 185.709,125.363 186.436,126.111 187.198,126.111 187.96,126.111 188.722,126.111 189.484,126.111 190.246,126.111 191.008,126.111 191.77,126.111 192.532,126.111 193.294,126.111 194.056,126.111 194.818,126.111 195.58,126.111 196.342,126.111 197.104,126.111 197.866,126.111 198.628,126.111 199.39,126.111 200.152,126.111 200.914,126.111 201.676,126.111 185.709,126.125 186.436,126.873 187.198,126.873 187.96,126.873 188.722,126.873 189.484,126.873 190.246,126.873 191.008,126.873 191.77,126.873 192.532,126.873 193.294,126.873 194.056,126.873 194.818,126.873 195.58,126.873 196.342,126.873 197.104,126.873 197.866,126.873 198.628,126.873 199.39,126.873 200.152,126.873 200.914,126.873 201.676,126.873 185.709,126.887 186.436,127.635 187.198,127.635 187.96,127.635 188.722,127.635 189.484,127.635 190.246,127.635 191.008,127.635 191.77,127.635 192.532,127.635 193.294,127.635 194.056,127.635 194.818,127.635 195.58,127.635 196.342,127.635 197.104,127.635 197.866,127.635 198.628,127.635 199.39,127.635 200.152,127.635 200.914,127.635 201.676,127.635 185.709,127.649 186.436,128.397 187.198,128.397 187.96,128.397 188.722,128.397 189.484,128.397 190.246,128.397 191.008,128.397 191.77,128.397 192.532,128.397 193.294,128.397 194.056,128.397 194.818,128.397 195.58,128.397 196.342,128.397 197.104,128.397 197.866,128.397 198.628,128.397 199.39,128.397 200.152,128.397 200.914,128.397 201.676,128.397 185.709,128.411 186.436,129.159 187.198,129.159 187.96,129.159 188.722,129.159 189.484,129.159 190.246,129.159 191.008,129.159 191.77,129.159 192.532,129.159 193.294,129.159 194.056,129.159 194.818,129.159 195.58,129.159 196.342,129.159 197.104,129.159 197.866,129.159 198.628,129.159 199.39,129.159 200.152,129.159 200.914,129.159 201.676,129.159 185.709,129.173 186.436,129.921 187.198,129.921 187.96,129.921 188.722,129.921 189.484,129.921 190.246,129.921 191.008,129.921 191.77,129.921 192.532,129.921 193.294,129.921 194.056,129.921 194.818,129.921 195.58,129.921 196.342,129.921 197.104,129.921 197.866,129.921 198.628,129.921 199.39,129.921 200.152,129.921 200.914,129.921 201.676,129.921 185.709,129.935 186.436,130.683 187.198,130.683 187.96,130.683 188.722,130.683 189.484,130.683 190.246,130.683 191.008,130.683 191.77,130.683 192.532,130.683 193.294,130.683 194.056,130.683 194.818,130.683 195.58,130.683 196.342,130.683 197.104,130.683 197.866,130.683 198.628,130.683 199.39,130.683 200.152,130.683 200.914,130.683 201.676,130.683 185.709,130.697 186.436,131.445 187.198,131.445 187.96,131.445 188.722,131.445 189.484,131.445 190.246,131.445 191.008,131.445 191.77,131.445 192.532,131.445 193.294,131.445 194.056,131.445 194.818,131.445 195.58,131.445 196.342,131.445 197.104,131.445 197.866,131.445 198.628,131.445 199.39,131.445 200.152,131.445 200.914,131.445 201.676,131.445 185.709,131.459 186.436,132.207 187.198,132.207 187.96,132.207 188.722,132.207 189.484,132.207 190.246,132.207 191.008,132.207 191.77,132.207 192.532,132.207 193.294,132.207 194.056,132.207 194.818,132.207 195.58,132.207 196.342,132.207 197.104,132.207 197.866,132.207 198.628,132.207 199.39,132.207 200.152,132.207 200.914,132.207 201.676,132.207 185.709,132.221 186.436,132.969 187.198,132.969 187.96,132.969 188.722,132.969 189.484,132.969 190.246,132.969 191.008,132.969 191.77,132.969 192.532,132.969 193.294,132.969 194.056,132.969 194.818,132.969 195.58,132.969 196.342,132.969 197.104,132.969 197.866,132.969 198.628,132.969 199.39,132.969 200.152,132.969 200.914,132.969 201.676,132.969 185.709,132.983 186.436,133.731 187.198,133.731 187.96,133.731 188.722,133.731 189.484,133.731 190.246,133.731 191.008,133.731 191.77,133.731 192.532,133.731 193.294,133.731 194.056,133.731 194.818,133.731 195.58,133.731 196.342,133.731 197.104,133.731 197.866,133.731 198.628,133.731 199.39,133.731 200.152,133.731 200.914,133.731 201.676,133.731 185.709,133.745 186.436,134.493 187.198,134.493 187.96,134.493 188.722,134.493 189.484,134.493 190.246,134.493 191.008,134.493 191.77,134.493 192.532,134.493 193.294,134.493 194.056,134.493 194.818,134.493 195.58,134.493 196.342,134.493 197.104,134.493 197.866,134.493 198.628,134.493 199.39,134.493 200.152,134.493 200.914,134.493 201.676,134.493 185.709,134.507
NetR1_1: R1.1 R7.2
NetR2_1: R2.1 R8.2
NetR2_2: R2.2 U2.5 VT1.2 VT2.2 | length 6.6
  Bottom Layer w1: v2@50.419,90.871 v2(50.419,90.932)
  Bottom Layer w2: v2@50.419,90.871 R2.2@53.286,88.005 ; R2.2@53.648,85.561 R2.2@53.648,88.011
NetR7_1: R7.1 R9.2
NetR8_1: R8.1 R10.2 | length 7.4
  Bottom Layer w0.254: R10.2@71.655,85.516 R10.2@71.655,87.966
  Bottom Layer w2: R8.1@69.188,85.516 R10.2@71.655,85.516 ; R8.1@69.188,87.966 R10.2@71.655,87.966
pads on no net: L1.3 Radiator_1.1 Radiator_2.1 U3.1 U3.4 U4.1 U4.4

## Polygon pours and split planes (outlines as drawn)
GND on Bottom Layer "NONET_L-01_P-001" (solid, pour order 15): 258.318,76.2 258.318,80.137 248.285,80.137 245.364,77.216 237.49,77.216 233.68,81.026 233.68,96.012 223.774,105.918 198.628,105.918 191.389,113.157 187.96,113.157 179.832,105.029 165.989,105.029 157.861,113.157 155.829,113.157 147.701,105.029 125.857,105.029 125.857,93.345 185.42,93.345 220.218,93.345 222.123,91.44 222.123,75.565 229.743,67.945 252.73,67.945 258.318,62.357 258.318,67.945
GND on Bottom Layer "NONET_L-01_P-001" (solid, pour order 8): 256.325,9.621 258.572,9.652 265.684,16.764 265.684,87.122 256.325,87.122
GND on Bottom Layer "NONET_L-01_P-001" (solid, pour order 9): 264.287,79.033 264.287,87.034 247.396,87.034 247.396,79.033
NetC3_2 on Bottom Layer "NONET_L-01_P-001" (solid, pour order 7): 232.252,65.366 232.252,57.365 251.81,57.365 251.81,65.366
NetC4_2 on Bottom Layer "NONET_L-01_P-001" (solid, pour order 6): 232.252,41.617 232.252,33.616 251.81,33.616 251.81,41.617
NetC2_2 on Bottom Layer "NONET_L-01_P-001" (solid, pour order 5): 232.283,17.526 232.283,9.525 251.841,9.525 251.841,17.526
NetL1_2 on Bottom Layer "NONET_L-01_P-001" (solid, pour order 3): 220.807,108.885 219.583,110.109 205.994,123.698 159.385,123.698 152.59,116.903 124.904,116.903 120.65,112.649 120.65,109.22 116.256,109.22 116.256,112.852 113.665,115.443 113.665,119.507 110.49,122.682 97.668,122.682 88.234,113.77 88.234,109.601 83.82,109.601 83.82,122.682 98.298,137.16 127.127,137.16 133.218,131.069 136.927,131.059 143.535,137.668 243.84,137.668 257.81,123.698 257.81,108.458 251.46,108.458 251.46,112.395 240.792,123.063 233.426,123.063 229.87,119.507 229.87,115.951 222.804,108.885
NetJ1_1 on Bottom Layer "NONET_L-01_P-001" (solid, pour order 2): 263.779,98.298 263.779,90.297 237.49,90.297 237.49,98.298
GND on Top Layer "NONET_L-01_P-001" (solid, pour order 22): 6.985,42.926 23.368,42.926 31.115,35.179 37.338,35.179 56.388,54.229 85.725,54.229 90.678,59.182 90.678,64.643 90.678,98.171 97.917,105.41 102.108,105.41 111.252,96.266 111.252,55.88 96.774,41.402 62.23,41.402 49.403,28.575 38.862,18.034 30.353,18.034 13.208,35.179 6.985,35.179
NetC16_2 on Top Layer "NONET_L-01_P-001" (solid, pour order 23): 52.324,61.722 52.324,59.563 53.721,58.166 84.455,58.166 85.979,59.69 85.979,61.976 84.709,63.246 53.848,63.246
NetC2_1 on Top Layer "NONET_L-01_P-001" (solid, pour order 10): 238.57,88.353 236.347,86.13 236.347,67.056 238.379,65.024 238.379,14.224 236.347,12.192 233.299,12.192 221.869,23.622 221.869,1.651 241.427,1.651 245.618,5.842 245.618,78.034 243.586,80.066 243.586,86.233 241.466,88.353
NetR2_2 on Top Layer "NONET_L-01_P-001" (solid, pour order 20): 28.448,68.58 26.035,68.58 19.304,75.311 19.304,111.887 20.574,113.157 22.225,113.157 23.495,111.887 23.495,107.95 29.591,101.854 48.006,101.854 51.181,105.029 51.181,111.633 52.705,113.157 54.356,113.157 55.753,111.76 55.753,94.488 48.895,87.63 36.83,87.63 34.798,85.598 34.798,74.93
NetC11_2 on Top Layer "NONET_L-01_P-001" (solid, pour order 19): 36.703,42.799 31.115,42.799 27.623,46.291 6.985,46.292 6.985,52.705 10.477,56.198 37.529,56.198 41.529,60.198 41.529,60.579 41.275,60.833 40.894,60.833 38.481,58.42 25.908,58.42 24.511,59.817 24.511,65.659 26.162,67.31 45.593,67.31 48.514,64.389 48.514,54.61
NetC2_1 on Top Layer "NONET_L-01_P-001" (solid, pour order 4): 248.158,122.047 248.158,109.855 233.68,95.377 233.68,67.183 231.775,65.278 231.775,1.778 221.869,1.778 221.869,96.393 221.869,99.695 226.314,104.14 226.314,112.649 223.901,115.062 218.567,115.062 212.344,108.839 208.788,108.839 208.788,115.316 222.915,129.443 240.762,129.443
NetL1_2 on Top Layer "NONET_L-01_P-001" (solid, pour order 18): 184.277,135 184.277,54.864 191.389,47.752 199.39,47.752 208.026,56.388 208.026,89.662 224.028,105.664 224.028,111.887 222.758,113.157 220.091,113.157 213.487,106.553 206.756,106.553 206.756,135
GND on Top Layer "NONET_L-01_P-001" (solid, pour order 17): 89.408,113.584 89.408,102.235 90.678,100.965 90.678,82.296 102.743,70.231 109.728,70.231 132.143,92.647 132.334,106.68 125.603,113.411 124.587,113.411 121.666,113.411 121.666,108.077 116.713,103.124 106.98,103.124 96.52,113.584
NetC2_1 on Top Layer "NONET_L-01_P-001" (solid, pour order 14): 223.774,38.989 230.378,38.989 233.68,35.687 233.68,19.05 221.996,7.366 219.075,10.287 219.075,34.29
NetC2_1 on Top Layer "NONET_L-01_P-001" (solid, pour order 13): 222.631,61.722 231.775,61.722 233.68,59.817 233.68,43.18 231.775,41.275 222.885,41.275 219.075,45.085 219.075,58.166
NetC2_1 on Top Layer "NONET_L-01_P-001" (solid, pour order 12): 238.664,62.007 245.618,62.007 248.9,58.724 248.9,44.176 245.618,40.894 238.506,40.894 236.22,43.18 236.22,59.563
NetC2_1 on Top Layer "NONET_L-01_P-001" (solid, pour order 11): 239.014,38.608 245.618,38.608 248.92,35.306 248.92,20.828 243.713,15.621 239.649,15.621 235.966,19.304 235.966,35.56
GND_II on Top Layer "NONET_L-01_P-001" (solid, pour order 1): 179.578,113.157 180.975,111.76 180.975,77.851 150.694,47.57 140.781,47.687 136.398,52.07 136.398,108.077 141.478,113.157 146.939,113.157 153.289,106.807 164.211,106.807 170.561,113.157
GND_II on Top Layer "NONET_L-01_P-001" (solid, pour order 0): 41.021,108.585 47.752,115.316 54.61,115.316 56.896,113.03 56.896,110.49 57.912,109.474 59.944,109.474 60.96,110.49 60.96,117.094 66.548,122.682 119.507,122.682 136.652,105.537 156.083,105.537 124.333,137.287 35.941,137.287 21.971,123.317 21.971,115.951 25.019,112.903 25.019,110.617 27.051,108.585

## Keep-outs
Keep-Out Layer:
  circle w0.254: c5,5 r1.5
  circle w0.254: c265,5 r1.5
  circle w0.254: c265,135 r1.5
  circle w0.254: c135,5 r1.5
  circle w0.254: c135,135 r1.5
  circle w0.254: c5,135 r1.5
  lines w0.254: 4.988,0 265,0 ccw(c265,5) 270,5 270,135 ccw(c265,135) 265,140 5,140 ccw(c5,135) 0,135 0,5 ccw(c5,5) 5,0

## Other copper
Top Layer:
  pour cut-out: 193.103,79.248 190.817,81.534 190.818,85.344 193.103,87.63 197.041,87.63 199.199,85.471 199.2,81.534 196.913,79.248
  pour cut-out: 143.256,79.248 140.97,81.534 140.97,85.344 143.256,87.63 147.193,87.63 149.352,85.471 149.352,81.534 147.066,79.248
  pour cut-out: 187.96,107.823 186.436,109.347 186.436,112.395 188.214,114.173 191.008,114.173 192.786,112.395 192.786,109.474 191.135,107.823
  pour cut-out: 197.612,112.141 194.818,114.935 194.818,119.38 197.866,122.428 202.311,122.428 205.105,119.634 205.105,114.935 202.311,112.141
  pour cut-out: 235.331,112.141 232.283,115.189 232.283,119.126 235.331,122.174 239.903,122.174 242.697,119.38 242.697,115.062 239.776,112.141
  pour cut-out: 30.48,112.141 27.305,115.316 27.305,119.126 30.48,122.301 34.671,122.301 37.719,119.253 37.719,115.062 34.798,112.141
Bottom Layer:
  rectangle net GND: 90.651,53.654 95.858,63.433
  rectangle net NetC16_2: 80.872,53.654 86.079,63.433
  rectangle net NetC16_2: 52.17,53.527 57.377,63.306
  rectangle net NetC11_2: 42.545,53.467 47.752,63.246
  rectangle net NetR2_1: 58.801,84.455 64.008,89.154
  region net NetR8_1: 72.771,84.455 72.771,89.027 67.945,89.027 67.945,84.455
  rectangle net NetD1_1: 40.64,85.725 44.831,96.774
  rectangle net NetD3_1: 105.41,70.739 109.601,96.901
  rectangle net GND: 259.715,82.169 265.684,86.995
  rectangle net NetC15_2: 259.334,101.219 263.271,105.283
  rectangle net NetR7_1: 250.444,101.092 254.762,105.283
  rectangle net NetR1_1: 241.681,101.219 245.872,105.41
  rectangle net NetC2_1: 221.869,8.89 228.092,66.294
  text "A" at 328.422,129.921 h1.52
  text "A" at 337.185,114.808 h1.52
  text "b" at 144.526,-23.749 h1.52

## Silkscreen, mask and mechanical layers (free items; w line width, h text height)
Top Overlay:
  circle w1: c265,135 r2
  circle w1: c265,5 r2
  circle w1: c135,135 r2
  circle w1: c135,5 r2
  circle w1: c5,135 r2
  circle w1: c5,5 r2
  text "GND  5V" at 1.524,88.265 h1 r270
  text "GND   VCC" at 268.813,82.469 h1.5 r90
  text "VCC  GND" at 1.824,50.881 h1.5 r270
  text "GND2  18V_2" at 115.951,1.691 h1
  text "GND1  18V_1" at 10.033,1.564 h1

## Text inside footprints (layer, text, board x,y; h text height)
C2: Top Overlay "+" at 223.765,17.992 h3.05; Top Overlay "-" at 234.433,17.484 h3.05
C3: Top Overlay "-" at 234.433,65.484 h3.05; Top Overlay "+" at 223.765,65.992 h3.05
C4: Top Overlay "+" at 223.765,41.992 h3.05; Top Overlay "-" at 234.433,41.484 h3.05
C6: Top Overlay "+" at 247.765,17.992 h3.05; Top Overlay "-" at 258.433,17.484 h3.05
C7: Top Overlay "+" at 247.765,65.992 h3.05; Top Overlay "-" at 258.433,65.484 h3.05
C8: Top Overlay "+" at 247.765,41.992 h3.05; Top Overlay "-" at 258.433,41.484 h3.05
C16: Top Overlay "+" at 40.505,63.842 h4; Top Overlay "-" at 57.904,64.033 h4
C17: Top Overlay "+" at 78.859,63.969 h4; Top Overlay "-" at 96.258,64.16 h4
DA1: Top Overlay "I2" at 84.189,5.031 h0.8 r270; Top Overlay "+5" at 86.663,5.031 h0.8 r270; Top Overlay "+5" at 76.613,5.031 h0.8 r270; Top Overlay "GND" at 79.139,5.031 h0.8 r270; Top Overlay "GND" at 51.25,5.031 h0.8 r270; Top Overlay "GND" at 48.575,5.031 h0.8 r270; Top Overlay "GND" at 63.839,5.031 h0.8 r270; Top Overlay "I1" at 81.564,5.031 h0.8 r270; Top Overlay "O_N2" at 74.172,5.031 h0.8 r270; Top Overlay "O_P2" at 71.695,5.031 h0.8 r270; Top Overlay "O_P1" at 66.322,5.031 h0.8 r270; Top Overlay "O_N1" at 69.263,5.031 h0.8 r270; Top Overlay "CAT_1" at 58.761,4.957 h0.8 r270; Top Overlay "AN_1" at 61.238,5.031 h0.8 r270; Top Overlay "AN_2" at 56.088,5.031 h0.8 r270; Top Overlay "CAT_2" at 53.611,5.307 h0.8 r270